# Altium PCB NB3000XN.PcbDoc (part 5 of 71)
Units mil, origin at the board's own origin, x right, y up, seen from the top; angles counter-clockwise.
Board outline 9527.56 x 6929.77 mil, 6 copper layers (Top Layer, GND+SHIELD, MidLayer1, MidLayer2, P2 - 3V3+5V0, Bottom Layer), stack 62.375 mil thick; 832 components, 1027 nets, 4655 pads, 4981 vias.
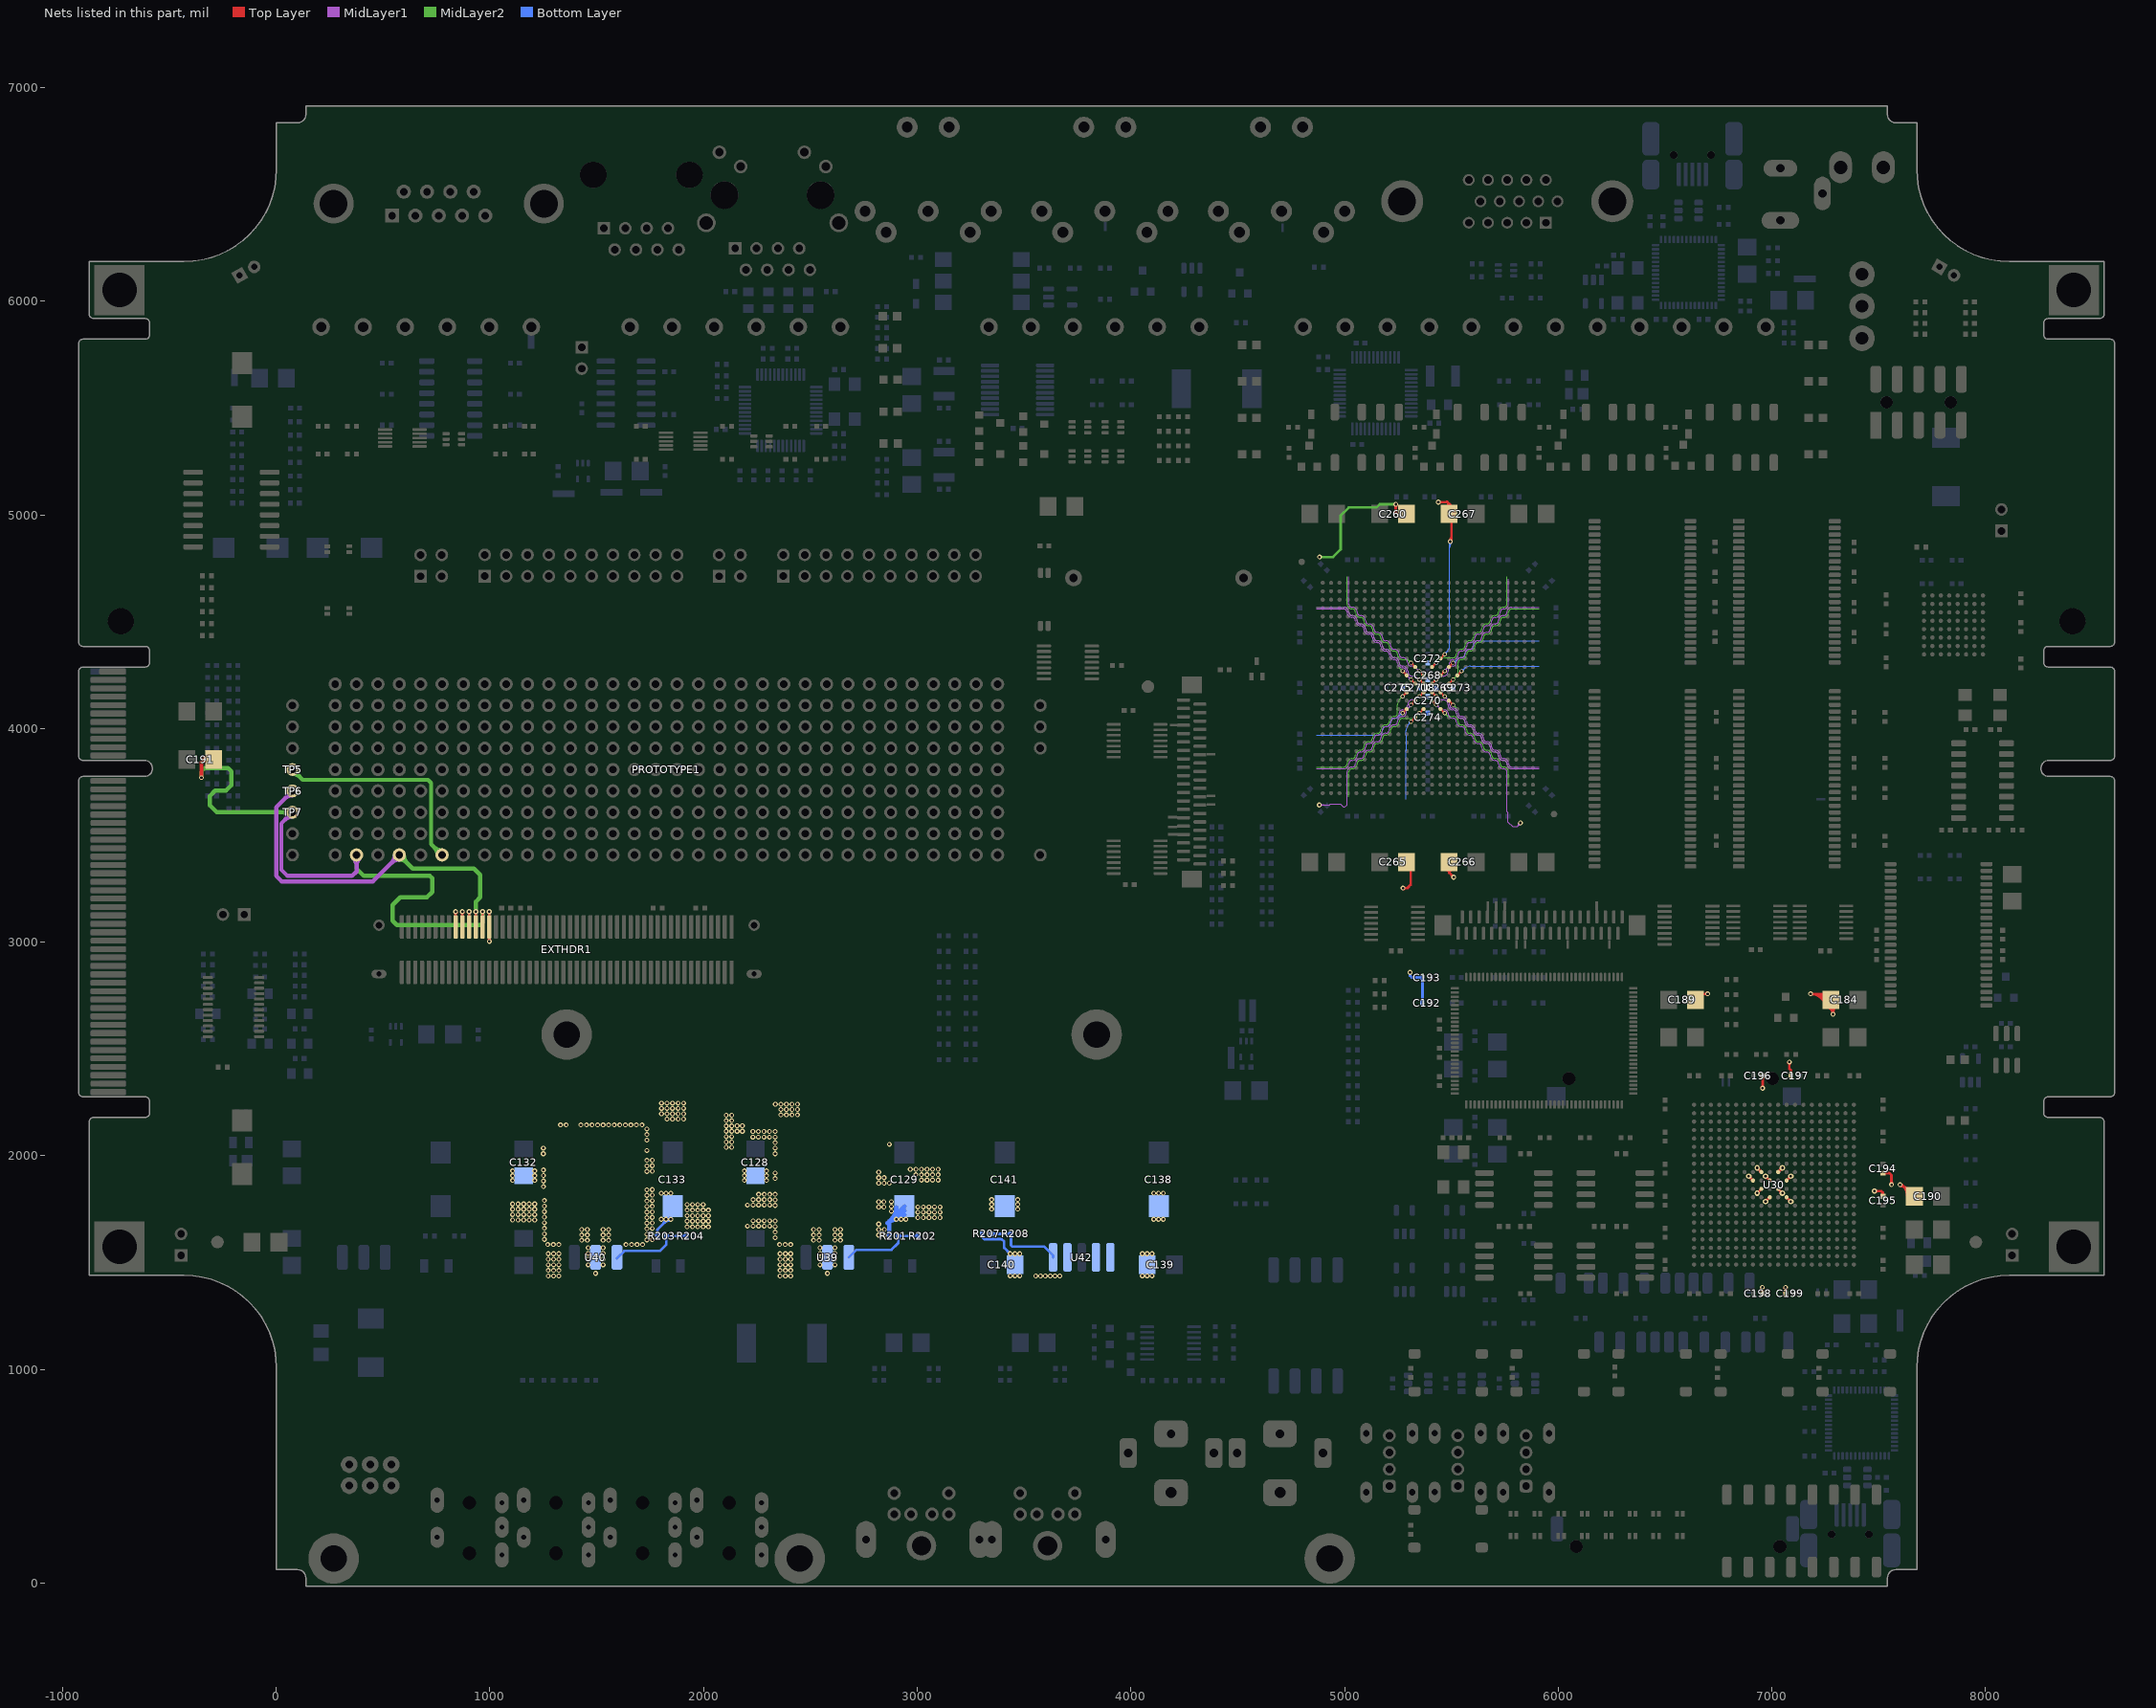
[diagram p9: the nets of this part, all layers, seen from the top]

## Via types
v1: diameter 23, hole 11.81, Top Layer to Bottom Layer, 3672 vias
v2: diameter 26, hole 11.81, Top Layer to Bottom Layer, 461 vias
v3: diameter 19, hole 11.81, Top Layer to Bottom Layer, tented both sides, 396 vias
v4: diameter 23.62, hole 11.81, Top Layer to Bottom Layer, 288 vias
v5: diameter 20, hole 11.81, Top Layer to Bottom Layer, 91 vias
v6: diameter 23, hole 11.81, Top Layer to Bottom Layer, tented both sides, 50 vias
v7: diameter 31, hole 11.81, Top Layer to Bottom Layer, 15 vias
v8: diameter 27.56, hole 11.81, Top Layer to Bottom Layer, tented both sides, 4 vias
v9: diameter 29, hole 11.81, Top Layer to Bottom Layer, 3 vias
v10: diameter 21, hole 11.81, Top Layer to Bottom Layer, 1 vias

## Nets (pads, with @x,y where several pads share a name; then routed paths per layer and width w, separated by ;. In a path a pad name is that pad's centre, name@x,y a point inside that pad or via, vN(x,y) a via of type N, cw(c..) or ccw(c..) an arc to the next point about the centre after c; other vN are vias at no path point)
1V2: C140.1 C141.1 C184.1 C189.1 C190.1 C191.1 C192.1 C193.1 C194.1 C195.1 C196.1 C197.1 C198.1 C199.1 C260.1 C265.1 C266.1 C267.1 C268.1 C269.1 C270.1 C271.1 C272.1 C273.1 C274.1 C275.1 EXTHDR1.73 EXTHDR1.75 PROTOTYPE1.2 R207.2 TP7.1 U8.K15 U8.L12 U8.L14 U8.L16 U8.M11 U8.M13 U8.M15 U8.M17 U8.N12 U8.N13 U8.N14 U8.N16 U8.P11 U8.P13 U8.P14 U8.P15 U8.R12 U8.R14 U8.R16 U8.T11 U8.T13 U8.T15 U8.U12 U30.J10 U30.J12 U30.K9 U30.K11 U30.L10 U30.L12 U30.M9 U30.M11 U30.N10 U42.4 | length 25616.4
  Top Layer w4: v3(5271.89,4071.89) U8.T11@5291.57,4091.57 ; v3(5271.89,4150.63) U8.P11@5291.57,4170.31 ; v3(5271.89,4268.74) U8.M11@5291.57,4249.06 ; U8.T11@5284.07,4091.57 cw(c5265.97,4091.57) 5278.77,4078.77 cw(c5291.57,4065.97) U8.T11@5291.57,4084.07 ; U8.P11@5284.07,4170.32 cw(c5265.97,4170.32) 5278.77,4157.51 cw(c5291.57,4144.71) U8.P11@5291.57,4162.81 ; U8.M11@5284.07,4249.06 ccw(c5265.97,4249.06) 5278.77,4261.86 ccw(c5291.57,4274.66) U8.M11@5291.57,4256.56 ; U8.T11@5284.23,4091.57 cw(c5266.51,4091.57) 5279.04,4079.04 cw(c5291.57,4066.51) U8.T11@5291.57,4084.23 ; U8.P11@5284.23,4170.32 cw(c5266.51,4170.32) 5279.04,4157.78 cw(c5291.57,4145.25) U8.P11@5291.57,4162.97 ; U8.M11@5284.23,4249.06 ccw(c5266.51,4249.06) 5279.04,4261.59 ccw(c5291.57,4274.12) U8.M11@5291.57,4256.4 ; v3(5311.26,4032.52) U8.U12@5330.94,4052.2 ; v3(5311.26,4111.26) U8.R12@5330.94,4130.94 ; v3(5311.26,4229.37) U8.N12@5330.94,4209.69 ; v3(5311.26,4308.11) U8.L12@5330.94,4288.43 ; U8.U12@5323.44,4052.2 cw(c5305.34,4052.2) 5318.14,4039.4 cw(c5330.94,4026.6) U8.U12@5330.94,4044.7 ; U8.R12@5323.44,4130.94 cw(c5305.34,4130.94) 5318.14,4118.14 cw(c5330.94,4105.34) U8.R12@5330.94,4123.44 ; U8.N12@5323.44,4209.69 ccw(c5305.34,4209.68) 5318.14,4222.49 ccw(c5330.94,4235.29) U8.N12@5330.94,4217.19 ; U8.L12@5323.44,4288.43 ccw(c5305.34,4288.43) 5318.14,4301.23 ccw(c5330.94,4314.03) U8.L12@5330.94,4295.93 ; U8.U12@5323.6,4052.2 cw(c5305.88,4052.2) 5318.41,4039.67 cw(c5330.94,4027.14) U8.U12@5330.94,4044.86 ; U8.R12@5323.6,4130.94 cw(c5305.88,4130.94) 5318.41,4118.41 cw(c5330.94,4105.88) U8.R12@5330.94,4123.6 ; U8.N12@5323.6,4209.69 ccw(c5305.88,4209.68) 5318.41,4222.22 ccw(c5330.94,4234.75) U8.N12@5330.94,4217.03 ; U8.L12@5323.6,4288.43 ccw(c5305.88,4288.43) 5318.41,4300.96 ccw(c5330.94,4313.49) U8.L12@5330.94,4295.77 ; v3(5350.63,4071.89) U8.T13@5370.31,4091.57 ; v3(5350.63,4150.63) U8.P13@5370.31,4170.31 ; v3(5350.63,4229.37) U8.N13@5370.31,4209.69 ; v3(5350.63,4268.74) U8.M13@5370.31,4249.06 ; U8.T13@5362.81,4091.57 cw(c5344.71,4091.57) 5357.51,4078.77 cw(c5370.31,4065.97) U8.T13@5370.31,4084.07 ; U8.P13@5362.81,4170.32 cw(c5344.71,4170.32) 5357.51,4157.51 cw(c5370.31,4144.71) U8.P13@5370.31,4162.81 ; U8.N13@5362.81,4209.69 ccw(c5344.71,4209.68) 5357.51,4222.49 ccw(c5370.31,4235.29) U8.N13@5370.31,4217.19 ; U8.M13@5362.81,4249.06 ccw(c5344.71,4249.06) 5357.51,4261.86 ccw(c5370.31,4274.66) U8.M13@5370.31,4256.56 ; U8.T13@5362.97,4091.57 cw(c5345.25,4091.57) 5357.78,4079.04 cw(c5370.31,4066.51) U8.T13@5370.31,4084.23 ; U8.P13@5362.97,4170.32 cw(c5345.25,4170.32) 5357.78,4157.78 cw(c5370.31,4145.25) U8.P13@5370.31,4162.97 ; U8.N13@5362.97,4209.69 ccw(c5345.25,4209.68) 5357.78,4222.22 ccw(c5370.31,4234.75) U8.N13@5370.31,4217.03 ; U8.M13@5362.97,4249.06 ccw(c5345.25,4249.06) 5357.78,4261.59 ccw(c5370.31,4274.12) U8.M13@5370.31,4256.4 ; U8.R14@5409.69,4123.44 cw(c5409.69,4105.34) 5422.49,4118.14 cw(c5435.29,4130.94) U8.R14@5417.19,4130.94 ; U8.R14@5409.69,4123.6 cw(c5409.69,4105.88) 5422.22,4118.41 cw(c5434.75,4130.94) U8.R14@5417.03,4130.94 ; U8.R14@5409.69,4130.94 v3(5429.37,4111.26) ; U8.P14@5409.69,4162.81 cw(c5409.69,4144.71) 5422.49,4157.51 cw(c5435.29,4170.32) U8.P14@5417.19,4170.32 ; U8.P14@5409.69,4162.97 cw(c5409.69,4145.25) 5422.22,4157.78 cw(c5434.75,4170.32) U8.P14@5417.03,4170.32 ; U8.P14@5409.69,4170.31 v3(5429.37,4150.63) ; U8.N14@5409.69,4209.69 v3(5429.37,4229.37) ; U8.N14@5409.69,4217.03 ccw(c5409.69,4234.75) 5422.22,4222.22 ccw(c5434.75,4209.68) U8.N14@5417.03,4209.69 ; U8.N14@5409.69,4217.19 ccw(c5409.69,4235.29) 5422.49,4222.49 ccw(c5435.29,4209.68) U8.N14@5417.19,4209.69 ; U8.L14@5409.69,4288.43 v3(5429.37,4308.11) ; U8.L14@5409.69,4295.77 ccw(c5409.69,4313.49) 5422.22,4300.96 ccw(c5434.75,4288.43) U8.L14@5417.03,4288.43 ; U8.L14@5409.69,4295.93 ccw(c5409.69,4314.03) 5422.49,4301.23 ccw(c5435.29,4288.43) U8.L14@5417.19,4288.43 ; U8.T15@5449.06,4084.07 cw(c5449.06,4065.97) 5461.86,4078.77 cw(c5474.66,4091.57) U8.T15@5456.56,4091.57 ; U8.T15@5449.06,4084.23 cw(c5449.06,4066.51) 5461.59,4079.04 cw(c5474.12,4091.57) U8.T15@5456.4,4091.57 ; U8.T15@5449.06,4091.57 v3(5468.74,4071.89) ; U8.P15@5449.06,4162.81 cw(c5449.06,4144.71) 5461.86,4157.51 cw(c5474.66,4170.32) U8.P15@5456.56,4170.32 ; U8.P15@5449.06,4162.97 cw(c5449.06,4145.25) 5461.59,4157.78 cw(c5474.12,4170.32) U8.P15@5456.4,4170.32 ; U8.P15@5449.06,4170.31 v3(5468.74,4150.63) ; U8.M15@5449.06,4249.06 v3(5468.74,4268.74) ; U8.M15@5449.06,4256.4 ccw(c5449.06,4274.12) 5461.59,4261.59 ccw(c5474.12,4249.06) U8.M15@5456.4,4249.06 ; U8.M15@5449.06,4256.56 ccw(c5449.06,4274.66) 5461.86,4261.86 ccw(c5474.66,4249.06) U8.M15@5456.56,4249.06 ; U8.K15@5449.06,4327.8 v3(5468.74,4347.48) ; U8.K15@5449.06,4335.14 ccw(c5449.06,4352.86) 5461.59,4340.33 ccw(c5474.12,4327.8) U8.K15@5456.4,4327.8 ; U8.K15@5449.06,4335.3 ccw(c5449.06,4353.4) 5461.86,4340.6 ccw(c5474.66,4327.8) U8.K15@5456.56,4327.8 ; U8.R16@5488.43,4123.44 cw(c5488.43,4105.34) 5501.23,4118.14 cw(c5514.03,4130.94) U8.R16@5495.93,4130.94 ; U8.R16@5488.43,4123.6 cw(c5488.43,4105.88) 5500.96,4118.41 cw(c5513.49,4130.94) U8.R16@5495.77,4130.94 ; U8.R16@5488.43,4130.94 v3(5508.11,4111.26) ; U8.N16@5488.43,4209.69 v3(5508.11,4229.37) ; U8.N16@5488.43,4217.03 ccw(c5488.43,4234.75) 5500.96,4222.22 ccw(c5513.49,4209.68) U8.N16@5495.77,4209.69 ; U8.N16@5488.43,4217.19 ccw(c5488.43,4235.29) 5501.23,4222.49 ccw(c5514.03,4209.68) U8.N16@5495.93,4209.69 ; U8.L16@5488.43,4288.43 v3(5508.11,4308.11) ; U8.L16@5488.43,4295.77 ccw(c5488.43,4313.49) 5500.96,4300.96 ccw(c5513.49,4288.43) U8.L16@5495.77,4288.43 ; U8.L16@5488.43,4295.93 ccw(c5488.43,4314.03) 5501.23,4301.23 ccw(c5514.03,4288.43) U8.L16@5495.93,4288.43 ; U8.M17@5527.8,4249.06 v3(5547.48,4268.74) ; U8.M17@5527.8,4256.4 ccw(c5527.8,4274.12) 5540.33,4261.59 ccw(c5552.86,4249.06) U8.M17@5535.14,4249.06 ; U8.M17@5527.8,4256.56 ccw(c5527.8,4274.66) 5540.6,4261.86 ccw(c5553.4,4249.06) U8.M17@5535.3,4249.06 ; C196.1@6956.86,2375 C196.1@6956.86,2376.19 ; v1@5234.86,5050.04 5240,5050.04 v1@5234.9,5050 ; v1@5234.86,5050.04 v1@5234.9,5050 ; 5284.69,4084.69 cw(c5271.89,4097.5) 5271.89,4079.39 ccw(c5271.89,4097.5) 5284.69,4084.69 ; 5284.69,4084.69 ccw(c5297.5,4071.89) 5279.39,4071.89 cw(c5297.5,4071.89) 5284.69,4084.69 ; 5284.69,4163.43 cw(c5271.89,4176.24) 5271.89,4158.13 ccw(c5271.89,4176.24) 5284.69,4163.43 ; 5284.69,4163.43 ccw(c5297.5,4150.63) 5279.39,4150.63 cw(c5297.5,4150.63) 5284.69,4163.43 ; 5284.69,4255.94 cw(c5297.5,4268.74) 5279.39,4268.74 ccw(c5297.5,4268.74) 5284.69,4255.94 ; 5284.69,4255.94 ccw(c5271.89,4243.13) 5271.89,4261.24 cw(c5271.89,4243.13) 5284.69,4255.94 ; 5324.06,4045.32 cw(c5311.26,4058.13) 5311.26,4040.02 ccw(c5311.26,4058.13) 5324.06,4045.32 ; 5324.06,4045.32 ccw(c5336.87,4032.52) 5318.76,4032.52 cw(c5336.87,4032.52) 5324.06,4045.32 ; 5324.06,4124.06 cw(c5311.26,4136.87) 5311.26,4118.76 ccw(c5311.26,4136.87) 5324.06,4124.06 ; 5324.06,4124.06 ccw(c5336.87,4111.26) 5318.76,4111.26 cw(c5336.87,4111.26) 5324.06,4124.06 ; 5324.06,4216.57 cw(c5336.87,4229.37) 5318.76,4229.37 ccw(c5336.87,4229.37) 5324.06,4216.57 ; 5324.06,4216.57 ccw(c5311.26,4203.76) 5311.26,4221.87 cw(c5311.26,4203.76) 5324.06,4216.57 ; 5324.06,4295.31 cw(c5336.87,4308.11) 5318.76,4308.11 ccw(c5336.87,4308.11) 5324.06,4295.31 ; 5324.06,4295.31 ccw(c5311.26,4282.5) 5311.26,4300.61 cw(c5311.26,4282.5) 5324.06,4295.31 ; 5363.43,4084.69 cw(c5350.63,4097.5) 5350.63,4079.39 ccw(c5350.63,4097.5) 5363.43,4084.69 ; 5363.43,4084.69 ccw(c5376.24,4071.89) 5358.13,4071.89 cw(c5376.24,4071.89) 5363.43,4084.69 ; 5363.43,4163.43 cw(c5350.63,4176.24) 5350.63,4158.13 ccw(c5350.63,4176.24) 5363.43,4163.43 ; 5363.43,4163.43 ccw(c5376.24,4150.63) 5358.13,4150.63 cw(c5376.24,4150.63) 5363.43,4163.43 ; 5363.43,4216.57 cw(c5376.24,4229.37) 5358.13,4229.37 ccw(c5376.24,4229.37) 5363.43,4216.57 ; 5363.43,4216.57 ccw(c5350.63,4203.76) 5350.63,4221.87 cw(c5350.63,4203.76) 5363.43,4216.57 ; 5363.43,4255.94 cw(c5376.24,4268.74) 5358.13,4268.74 ccw(c5376.24,4268.74) 5363.43,4255.94 ; 5363.43,4255.94 ccw(c5350.63,4243.13) 5350.63,4261.24 cw(c5350.63,4243.13) 5363.43,4255.94 ; 5416.57,4124.06 cw(c5403.76,4111.26) 5421.87,4111.26 ccw(c5403.76,4111.26) 5416.57,4124.06 ; 5416.57,4124.06 ccw(c5429.37,4136.87) 5429.37,4118.76 cw(c5429.37,4136.87) 5416.57,4124.06 ; 5416.57,4163.43 cw(c5403.76,4150.63) 5421.87,4150.63 ccw(c5403.76,4150.63) 5416.57,4163.43 ; 5416.57,4163.43 ccw(c5429.37,4176.24) 5429.37,4158.13 cw(c5429.37,4176.24) 5416.57,4163.43 ; 5416.57,4216.57 cw(c5429.37,4203.76) 5429.37,4221.87 ccw(c5429.37,4203.76) 5416.57,4216.57 ; 5416.57,4216.57 ccw(c5403.76,4229.37) 5421.87,4229.37 cw(c5403.76,4229.37) 5416.57,4216.57 ; 5416.57,4295.31 cw(c5429.37,4282.5) 5429.37,4300.61 ccw(c5429.37,4282.5) 5416.57,4295.31 ; 5416.57,4295.31 ccw(c5403.76,4308.11) 5421.87,4308.11 cw(c5403.76,4308.11) 5416.57,4295.31 ; 5455.94,4084.69 cw(c5443.13,4071.89) 5461.24,4071.89 ccw(c5443.13,4071.89) 5455.94,4084.69 ; 5455.94,4084.69 ccw(c5468.74,4097.5) 5468.74,4079.39 cw(c5468.74,4097.5) 5455.94,4084.69 ; 5455.94,4163.43 cw(c5443.13,4150.63) 5461.24,4150.63 ccw(c5443.13,4150.63) 5455.94,4163.43 ; 5455.94,4163.43 ccw(c5468.74,4176.24) 5468.74,4158.13 cw(c5468.74,4176.24) 5455.94,4163.43 ; 5455.94,4255.94 cw(c5468.74,4243.13) 5468.74,4261.24 ccw(c5468.74,4243.13) 5455.94,4255.94 ; 5455.94,4255.94 ccw(c5443.13,4268.74) 5461.24,4268.74 cw(c5443.13,4268.74) 5455.94,4255.94 ; 5455.94,4334.68 cw(c5468.74,4321.87) 5468.74,4339.98 ccw(c5468.74,4321.87) 5455.94,4334.68 ; 5455.94,4334.68 ccw(c5443.13,4347.48) 5461.24,4347.48 cw(c5443.13,4347.48) 5455.94,4334.68 ; 5495.31,4124.06 cw(c5482.5,4111.26) 5500.61,4111.26 ccw(c5482.5,4111.26) 5495.31,4124.06 ; 5495.31,4124.06 ccw(c5508.11,4136.87) 5508.11,4118.76 cw(c5508.11,4136.87) 5495.31,4124.06 ; 5495.31,4216.57 cw(c5508.11,4203.76) 5508.11,4221.87 ccw(c5508.11,4203.76) 5495.31,4216.57 ; 5495.31,4216.57 ccw(c5482.5,4229.37) 5500.61,4229.37 cw(c5482.5,4229.37) 5495.31,4216.57 ; 5495.31,4295.31 cw(c5508.11,4282.5) 5508.11,4300.61 ccw(c5508.11,4282.5) 5495.31,4295.31 ; 5495.31,4295.31 ccw(c5482.5,4308.11) 5500.61,4308.11 cw(c5482.5,4308.11) 5495.31,4295.31 ; 5534.68,4255.94 cw(c5547.48,4243.13) 5547.48,4261.24 ccw(c5547.48,4243.13) 5534.68,4255.94 ; 5534.68,4255.94 ccw(c5521.87,4268.74) 5539.98,4268.74 cw(c5521.87,4268.74) 5534.68,4255.94
  Top Layer w8: v2@6891.89,1895.37 cw(c6891.89,1873.64) 6907.25,1889.01 cw(c6922.62,1904.37) v2@6900.89,1904.37 ; v2(6891.89,1904.37) U30.N10@6911.57,1884.68 ; U30.N10@6905.73,1884.68 ccw(c6891.63,1884.68) 6901.6,1894.66 ccw(c6911.57,1904.63) U30.N10@6911.57,1890.53 ; v2(6931.26,1825.63) U30.M11@6950.94,1845.31 ; v2@6931.26,1834.63 ccw(c6931.26,1856.36) 6946.62,1840.99 ccw(c6961.99,1825.63) v2@6940.26,1825.63 ; v2@6931.26,1934.74 cw(c6931.26,1913.01) 6946.62,1928.38 cw(c6961.99,1943.74) v2@6940.26,1943.74 ; v2(6931.26,1943.74) U30.M9@6950.94,1924.06 ; U30.M11@6945.1,1845.31 cw(c6931,1845.31) 6940.97,1835.34 cw(c6950.94,1825.37) U30.M11@6950.94,1839.47 ; U30.M9@6945.1,1924.06 ccw(c6931,1924.06) 6940.97,1934.03 ccw(c6950.94,1944) U30.M9@6950.94,1929.9 ; v2(6970.63,1786.26) U30.L12@6990.31,1805.94 ; v2@6970.63,1795.26 ccw(c6970.63,1816.99) 6985.99,1801.62 ccw(c7001.36,1786.26) v2@6979.63,1786.26 ; v2@6970.63,1895.37 cw(c6970.63,1873.64) 6985.99,1889.01 cw(c7001.36,1904.37) v2@6979.63,1904.37 ; v2(6970.63,1904.37) U30.L10@6990.31,1884.68 ; U30.L12@6984.47,1805.94 cw(c6970.37,1805.94) 6980.34,1795.97 cw(c6990.31,1786) U30.L12@6990.31,1800.1 ; U30.L10@6984.47,1884.68 ccw(c6970.37,1884.68) 6980.34,1894.66 ccw(c6990.31,1904.63) U30.L10@6990.31,1890.53 ; U30.K11@7029.69,1839.47 cw(c7029.69,1825.37) 7039.66,1835.34 cw(c7049.63,1845.31) U30.K11@7035.53,1845.31 ; U30.K11@7029.69,1845.31 v2(7049.37,1825.63) ; U30.K9@7029.69,1924.06 v2(7049.37,1943.74) ; U30.K9@7029.69,1929.9 ccw(c7029.69,1944) 7039.66,1934.03 ccw(c7049.63,1924.06) U30.K9@7035.53,1924.06 ; v2@7040.37,1825.63 ccw(c7018.64,1825.63) 7034.01,1840.99 ccw(c7049.37,1856.36) v2@7049.37,1834.63 ; v2@7040.37,1943.74 cw(c7018.64,1943.74) 7034.01,1928.38 cw(c7049.37,1913.01) v2@7049.37,1934.74 ; U30.J12@7069.06,1800.1 cw(c7069.06,1786) 7079.03,1795.97 cw(c7089,1805.94) U30.J12@7074.9,1805.94 ; U30.J12@7069.06,1805.94 v2(7088.74,1786.26) ; U30.J10@7069.06,1884.68 v2(7088.74,1904.37) ; U30.J10@7069.06,1890.53 ccw(c7069.06,1904.63) 7079.03,1894.66 ccw(c7089,1884.68) U30.J10@7074.9,1884.68 ; v2@7079.74,1786.26 ccw(c7058.01,1786.26) 7073.38,1801.62 ccw(c7088.74,1816.99) v2@7088.74,1795.26 ; v2@7079.74,1904.37 cw(c7058.01,1904.37) 7073.38,1889.01 cw(c7088.74,1873.64) v2@7088.74,1895.37
  Top Layer w12: C191.1@-304.81,3842.2 C191.1@-292.01,3855 ; v1@961.92,3139.15 cw(c952.15,3129.38) 965.97,3129.38 ; EXTHDR1.75@965.97,3071.85 v1@965.97,3142.88 ; 965.97,3130.14 cw(c978.71,3130.14) v1@969.7,3139.15 ; v1@993.42,3139.15 cw(c983.65,3129.38) 997.46,3129.38 ; v1@993.73,3007.7 ccw(c984.72,3016.71) 997.46,3016.71 ; v1@997.46,3003.96 EXTHDR1.73@997.46,3071.85 ; EXTHDR1.73@997.46,3017.46 ccw(c1011.28,3017.46) v1@1001.51,3007.7 ; EXTHDR1.73@997.46,3075 EXTHDR1.73@997.46,3071.85 ; 997.46,3130.14 cw(c1010.21,3130.14) v1@1001.2,3139.15 ; v1@997.46,3142.88 EXTHDR1.73@997.46,3071.85 ; v1@5236.11,5046.11 cw(c5226.72,5036.72) 5240,5036.72 cw(c5253.28,5036.72) v1@5243.89,5046.11 ; v1(5240,5050) 5240,5015 5250,5005 ; C260.1@5257.53,4998.77 ccw(c5250,4997.33) 5250,5005 ; C260.1@5257.53,5011.23 cw(c5250,5012.67) 5250,5005 ; v1(5273.52,3253.37) 5294.52,3253.37 5310,3268.85 5310,3345.31 5290.31,3365 C265.1@5290.31,3375 ; v1@5277.41,3249.49 cw(c5286.8,3240.1) 5286.8,3253.37 cw(c5286.8,3266.65) v1@5277.41,3257.26 ; C260.1@5290.31,5005 5250,5005 ; v1(5438.86,5059.71) 5481.69,5059.71 5489.68,5051.71 ; v1@5442.75,5055.82 cw(c5452.14,5046.43) 5452.14,5059.71 cw(c5452.14,5072.99) v1@5442.75,5063.6 ; 5479.46,5061.94 cw(c5454.23,5036.72) C267.1@5482.31,5014.72 ; C266.1@5479.65,3339.24 cw(c5475.33,3325.55) 5489.69,3325.55 ; C267.1@5481.57,5041.31 ccw(c5478.96,5051.71) 5489.68,5051.71 ; 5489.03,5052.36 cw(c5464.97,5028.3) C267.1@5491.76,5007.32 ; C266.1@5489.68,3375 5489.69,3325.55 ; v1@5491.11,4878.89 ccw(c5466.78,4903.22) 5501.19,4903.22 ; C267.1@5497.8,5041.31 cw(c5500.41,5051.71) 5489.69,5051.71 ; C266.1@5499.72,3339.24 ccw(c5504.04,3325.55) 5489.69,3325.55 ; v1@5501.19,4875 5501.19,4993.49 C267.1@5489.68,5005 5489.68,5051.71 ; v1@5505.69,3304.04 ccw(c5492.41,3304.04) 5501.8,3313.43 ccw(c5511.19,3322.82) v1@5511.19,3309.54 ; v1(5511.19,3304.04) 5489.69,3325.55 ; C189.1@6642.99,2730 6671.37,2758.37 v1(6699.86,2758.37) ; v1@6695.97,2754.49 ccw(c6686.58,2745.1) 6686.58,2758.37 ccw(c6686.58,2771.65) v1@6695.97,2762.26 ; C198.1@6951.56,1359.11 ccw(c6941.64,1369.03) 6955.67,1369.03 ccw(c6969.7,1369.03) C198.1@6959.78,1359.11 ; C196.1@6951.56,2370.89 cw(c6938.77,2358.1) 6956.86,2358.1 ; v1@6951.78,1380.44 cw(c6942.39,1371.05) 6955.67,1371.05 cw(c6968.95,1371.05) v1@6959.56,1380.44 ; v1@6952.97,2320.6 ccw(c6943.58,2329.99) 6956.86,2329.99 ccw(c6970.14,2329.99) v1@6960.75,2320.6 ; C198.1@6955.67,1355 v1(6955.67,1384.33) ; C196.1@6955.67,2375 6956.86,2373.81 v1(6956.86,2316.71) ; C199.1@7060.22,1359.11 ccw(c7050.3,1369.03) 7064.33,1369.03 ccw(c7078.36,1369.03) C199.1@7068.44,1359.11 ; v1@7060.44,1380.44 cw(c7051.05,1371.05) 7064.33,1371.05 cw(c7077.61,1371.05) v1@7068.22,1380.44 ; C199.1@7064.33,1355 v1(7064.33,1384.33) ; v1@7077.97,2435.49 cw(c7068.58,2426.1) 7081.86,2426.1 cw(c7095.14,2426.1) v1@7085.75,2435.49 ; v1(7081.86,2439.37) 7081.86,2408.14 7089.33,2400.67 C197.1@7089.33,2375 ; C197.1@7085.22,2379.11 ccw(c7075.3,2389.03) 7089.33,2389.03 ccw(c7103.36,2389.03) C197.1@7093.44,2379.11 ; v1@7185.08,2754.49 cw(c7194.47,2745.1) 7194.47,2758.37 cw(c7194.47,2771.65) v1@7185.08,2762.26 ; 7201.08,2758.37 cw(c7201.08,2693.92) C184.1@7258.1,2723.97 ; 7220.97,2758.37 cw(c7220.97,2704.4) C184.1@7268.72,2729.57 ; C184.1@7240.86,2758.37 cw(c7240.86,2714.89) C184.1@7279.33,2735.16 ; C184.1@7247.49,2718.38 ccw(c7181.19,2683.44) v1(7181.19,2758.37) 7248.63,2758.37 C184.1@7277.01,2730 7286.52,2720.48 v1(7286.52,2662.71) ; C184.1@7264.29,2695.21 cw(c7250.6,2662) v1@7286.52,2662 ; C184.1@7268.86,2706.31 cw(c7257.99,2679.92) 7286.52,2679.92 ; v1@7282.64,2666.6 ccw(c7273.25,2675.99) 7286.52,2675.99 ccw(c7299.8,2675.99) v1@7290.41,2666.6 ; v1@7286.52,2668.47 cw(c7334.6,2668.47) C184.1@7300.6,2702.47 ; v4(7480,1835) 7513.5,1835 7520,1828.5 C195.1@7520,1810.67 ; v4@7484.11,1830.89 cw(c7494.03,1820.97) 7494.03,1835 cw(c7494.03,1849.03) v4@7484.11,1839.11 ; C195.1@7515.89,1814.78 ccw(c7505.97,1824.7) 7520,1824.7 ccw(c7534.03,1824.7) C195.1@7524.11,1814.78 ; C194.1@7520,1919.33 7550.67,1919.33 7560,1910 v4(7560,1865) ; C194.1@7524.11,1915.22 cw(c7534.03,1905.3) 7534.03,1919.33 cw(c7534.03,1933.36) C194.1@7524.11,1923.44 ; v4@7555.89,1869.11 ccw(c7545.97,1879.03) 7560,1879.03 ccw(c7574.03,1879.03) v4@7564.11,1869.11 ; v1@7600,1859.5 cw(c7600,1825.98) 7623.7,1849.68 ; v1(7600,1865) 7608.39,1865 7663.39,1810 C190.1@7667.01,1810 C190.1@7665.2,1808.19 ; 7612.17,1861.22 ccw(c7649.88,1898.93) C190.1@7660.41,1846.65 ; 7615.39,1858 cw(c7571.32,1813.94) C190.1@7633.64,1813.94 ; C190.1@7627.99,1845.39 ccw(c7655.19,1872.59) C190.1@7662.79,1834.89
  Top Layer w20: v10(-350,3770) -350,3845 -340,3855 ; -340.86,3854.14 cw(c-309.92,3823.19) C191.1@-286.26,3860.01 ; C191.1@-318.16,3841.64 ccw(c-340,3830.48) -340,3855 ; C191.1@-318.16,3868.36 cw(c-340,3879.52) -340,3855 ; C191.1@-292.01,3855 -340,3855
  MidLayer1 w4: 4870,3811.9 4879.78,3811.9 4938.04,3811.9 4996.3,3811.9 ccw(c4996.3,3835.67) 5020.07,3835.67 cw(c5035.67,3835.67) 5035.67,3851.27 ccw(c5035.67,3875.04) 5059.44,3875.04 cw(c5075.04,3875.04) 5075.04,3890.64 ccw(c5075.04,3914.41) 5098.81,3914.41 cw(c5114.41,3914.41) 5114.41,3930.01 ccw(c5114.41,3953.78) 5138.18,3953.78 cw(c5153.78,3953.78) 5153.78,3969.38 ccw(c5153.78,3993.15) 5177.55,3993.15 cw(c5193.15,3993.15) 5193.15,4008.75 ccw(c5193.15,4032.52) 5216.92,4032.52 cw(c5232.52,4032.52) 5232.52,4048.12 ccw(c5232.52,4071.89) 5256.29,4071.89 cw(c5271.89,4071.89) 5271.89,4087.49 ccw(c5271.89,4111.26) 5295.66,4111.26 cw(c5319.43,4111.26) 5319.43,4135.03 ; 4870,4559.93 4879.78,4559.93 4938.04,4559.93 4996.3,4559.93 cw(c4996.3,4544.33) 5011.9,4544.33 ccw(c5035.67,4544.33) 5035.67,4520.56 cw(c5035.67,4504.96) 5051.27,4504.96 ccw(c5075.04,4504.96) 5075.04,4481.19 cw(c5075.04,4465.59) 5090.64,4465.59 ccw(c5114.41,4465.59) 5114.41,4441.82 cw(c5114.41,4426.22) 5130.01,4426.22 ccw(c5153.78,4426.22) 5153.78,4402.45 cw(c5153.78,4386.85) 5169.38,4386.85 ccw(c5193.15,4386.85) 5193.15,4363.08 cw(c5193.15,4347.48) 5208.75,4347.48 ccw(c5232.52,4347.48) 5232.52,4323.71 cw(c5232.52,4308.11) 5248.12,4308.11 ccw(c5271.89,4308.11) 5271.89,4284.34 cw(c5271.89,4268.74) 5287.49,4268.74 ; 4870,4568.1 4879.78,4568.1 4938.04,4568.1 4996.3,4568.1 cw(c4996.3,4544.33) 5020.07,4544.33 ccw(c5035.67,4544.33) 5035.67,4528.73 cw(c5035.67,4504.96) 5059.44,4504.96 ccw(c5075.04,4504.96) 5075.04,4489.36 cw(c5075.04,4465.59) 5098.81,4465.59 ccw(c5114.41,4465.59) 5114.41,4449.99 cw(c5114.41,4426.22) 5138.18,4426.22 ccw(c5153.78,4426.22) 5153.78,4410.62 cw(c5153.78,4386.85) 5177.55,4386.85 ccw(c5193.15,4386.85) 5193.15,4371.25 cw(c5193.15,4347.48) 5216.92,4347.48 ccw(c5232.52,4347.48) 5232.52,4331.88 cw(c5232.52,4308.11) 5256.29,4308.11 ccw(c5271.89,4308.11) 5271.89,4292.51 cw(c5271.89,4268.74) 5295.66,4268.74 ccw(c5319.43,4268.74) 5319.43,4244.97 ; v1(4881.86,3642.37) 4930,3642.37 4933.5,3645.87 4980.44,3645.87 4993.31,3633 5001.69,3633 5011.9,3643.21 5011.9,3660 5011.9,3670 5011.9,3679.78 5011.9,3738.04 5011.9,3796.3 cw(c5035.67,3796.3) 5035.67,3820.07 ccw(c5035.67,3835.67) 5051.27,3835.67 cw(c5075.04,3835.67) 5075.04,3859.44 ccw(c5075.04,3875.04) 5090.64,3875.04 cw(c5114.41,3875.04) 5114.41,3898.81 ccw(c5114.41,3914.41) 5130.01,3914.41 cw(c5153.78,3914.41) 5153.78,3938.18 ccw(c5153.78,3953.78) 5169.38,3953.78 cw(c5193.15,3953.78) 5193.15,3977.55 ccw(c5193.15,3993.15) 5208.75,3993.15 cw(c5232.52,3993.15) 5232.52,4016.92 ccw(c5232.52,4032.52) 5248.12,4032.52 cw(c5271.89,4032.52) 5271.89,4056.29 ccw(c5271.89,4071.89) 5287.49,4071.89 cw(c5311.26,4071.89) 5294.45,4088.7 5300.87,4096.43 ; v1@4881.86,4800.04 v1@4883,4800.04 ; v1(4883,4803) v1@4885.96,4800.04 ; v1@4885.75,3638.49 cw(c4895.14,3629.1) 4895.14,3642.37 cw(c4895.14,3655.65) v1@4885.75,3646.26 ; v1@4888.57,3635.66 cw(c4904.79,3619.44) 4904.79,3642.37 cw(c4904.79,3665.31) v1@4888.57,3649.09 ; 5020.07,4710 5020.07,4700.22 5020.07,4641.96 5020.07,4583.7 ccw(c5035.67,4583.7) 5035.67,4568.1 cw(c5035.67,4544.33) 5059.44,4544.33 ccw(c5075.04,4544.33) 5075.04,4528.73 cw(c5075.04,4504.96) 5098.81,4504.96 ccw(c5114.41,4504.96) 5114.41,4489.36 cw(c5114.41,4465.59) 5138.18,4465.59 ccw(c5153.78,4465.59) 5153.78,4449.99 cw(c5153.78,4426.22) 5177.55,4426.22 ccw(c5193.15,4426.22) 5193.15,4410.62 cw(c5193.15,4386.85) 5216.92,4386.85 ccw(c5232.52,4386.85) 5232.52,4371.25 cw(c5232.52,4347.48) 5256.29,4347.48 ccw(c5271.89,4347.48) 5271.89,4331.88 cw(c5271.89,4308.11) 5295.66,4308.11 ccw(c5311.26,4308.11) 5311.26,4292.51 ; 5287.4,4269.25 ccw(c5326.07,4269.25) 5298.73,4241.9 ; v3@5303.87,4109.96 cw(c5286.04,4106.81) 5300.87,4096.43 ; v3@5303.92,4229.37 ccw(c5286.19,4229.37) 5298.73,4241.9 ; 5310.75,4292.6 cw(c5310.75,4253.93) 5338.1,4281.27 ; v3@5311.26,4236.71 cw(c5311.26,4254.44) 5298.73,4241.9 ; v3@5312.56,4103.87 ccw(c5315.71,4086.04) 5300.87,4096.43 ; 5319.43,4135.08 ccw(c5321.04,4158.8) 5335.83,4140.2 ; 5319.43,4244.92 cw(c5321.04,4221.2) 5335.83,4239.8 ; v3@5343.24,4151.93 cw(c5325.41,4155.08) 5335.8,4140.24 cw(c5346.18,4125.41) v3@5349.33,4143.24 ; v3@5343.24,4228.07 ccw(c5325.41,4224.92) 5335.8,4239.76 ccw(c5346.18,4254.59) v3@5349.33,4236.76 ; v3@5343.29,4268.74 ccw(c5325.56,4268.74) 5338.1,4281.27 ; v3@5350.63,4276.08 cw(c5350.63,4293.81) 5338.1,4281.27 ; v3@5429.37,4103.92 cw(c5429.37,4086.19) 5441.9,4098.73 ; v3@5430.67,4143.24 cw(c5433.82,4125.41) 5444.2,4140.24 cw(c5454.59,4155.08) v3@5436.76,4151.93 ; v3@5430.67,4236.76 ccw(c5433.82,4254.59) 5444.2,4239.76 ccw(c5454.59,4224.92) v3@5436.76,4228.07 ; v3@5436.71,4111.26 ccw(c5454.44,4111.26) 5441.9,4098.73 ; 5444.17,4140.2 ccw(c5458.96,4158.8) 5460.57,4135.08 ; 5444.17,4239.8 cw(c5458.96,4221.2) 5460.57,4244.92 ; 5460.57,4135.03 cw(c5460.57,4111.26) 5484.34,4111.26 ccw(c5508.11,4111.26) 5508.11,4087.49 cw(c5508.11,4071.89) 5523.71,4071.89 ccw(c5547.48,4071.89) 5547.48,4048.12 cw(c5547.48,4032.52) 5563.08,4032.52 ccw(c5586.85,4032.52) 5586.85,4008.75 cw(c5586.85,3993.15) 5602.45,3993.15 ccw(c5626.22,3993.15) 5626.22,3969.38 cw(c5626.22,3953.78) 5641.82,3953.78 ccw(c5665.59,3953.78) 5665.59,3930.01 cw(c5665.59,3914.41) 5681.19,3914.41 ccw(c5704.96,3914.41) 5704.96,3890.64 cw(c5704.96,3875.04) 5720.56,3875.04 ccw(c5744.33,3875.04) 5744.33,3851.27 cw(c5744.33,3835.67) 5759.93,3835.67 ccw(c5783.7,3835.67) 5783.7,3811.9 5841.96,3811.9 5900.22,3811.9 5910,3811.9 ; 5460.57,4244.97 ccw(c5460.57,4268.74) 5484.34,4268.74 cw(c5508.11,4268.74) 5508.11,4292.51 ccw(c5508.11,4308.11) 5523.71,4308.11 cw(c5547.48,4308.11) 5547.48,4331.88 ccw(c5547.48,4347.48) 5563.08,4347.48 cw(c5586.85,4347.48) 5586.85,4371.25 ccw(c5586.85,4386.85) 5602.45,4386.85 cw(c5626.22,4386.85) 5626.22,4410.62 ccw(c5626.22,4426.22) 5641.82,4426.22 cw(c5665.59,4426.22) 5665.59,4449.99 ccw(c5665.59,4465.59) 5681.19,4465.59 cw(c5704.96,4465.59) 5704.96,4489.36 ccw(c5704.96,4504.96) 5720.56,4504.96 cw(c5744.33,4504.96) 5744.33,4528.73 ccw(c5744.33,4544.33) 5759.93,4544.33 cw(c5783.7,4544.33) 5783.7,4568.1 5841.96,4568.1 5900.22,4568.1 5910,4568.1 ; v3@5467.44,4276.13 ccw(c5464.29,4293.96) 5479.13,4283.57 ; 5468.74,4087.49 cw(c5468.74,4071.89) 5484.34,4071.89 ccw(c5508.11,4071.89) 5508.11,4048.12 cw(c5508.11,4032.52) 5523.71,4032.52 ccw(c5547.48,4032.52) 5547.48,4008.75 cw(c5547.48,3993.15) 5563.08,3993.15 ccw(c5586.85,3993.15) 5586.85,3969.38 cw(c5586.85,3953.78) 5602.45,3953.78 ccw(c5626.22,3953.78) 5626.22,3930.01 cw(c5626.22,3914.41) 5641.82,3914.41 ccw(c5665.59,3914.41) 5665.59,3890.64 cw(c5665.59,3875.04) 5681.19,3875.04 ccw(c5704.96,3875.04) 5704.96,3851.27 cw(c5704.96,3835.67) 5720.56,3835.67 ccw(c5744.33,3835.67) 5744.33,3811.9 cw(c5744.33,3796.3) 5759.93,3796.3 5759.93,3738.04 5759.93,3679.78 5759.93,3670 5759.93,3660 5759.93,3655.26 5759.93,3610.07 5765,3605 5765,3562.82 5786.45,3541.37 5808.63,3541.37 5823.52,3556.27 v1(5823.52,3558.37) ; v3@5468.74,4143.29 cw(c5468.74,4125.56) 5481.27,4138.1 ; 5469.25,4087.4 cw(c5469.25,4126.07) 5441.9,4098.73 ; v3@5476.08,4150.63 ccw(c5493.81,4150.63) 5481.27,4138.1 ; v3@5476.13,4270.04 cw(c5493.96,4273.19) 5479.13,4283.57 ; 5492.51,4111.26 ccw(c5508.11,4111.26) 5508.11,4095.66 cw(c5508.11,4071.89) 5531.88,4071.89 ccw(c5547.48,4071.89) 5547.48,4056.29 cw(c5547.48,4032.52) 5571.25,4032.52 ccw(c5586.85,4032.52) 5586.85,4016.92 cw(c5586.85,3993.15) 5610.62,3993.15 ccw(c5626.22,3993.15) 5626.22,3977.55 cw(c5626.22,3953.78) 5649.99,3953.78 ccw(c5665.59,3953.78) 5665.59,3938.18 cw(c5665.59,3914.41) 5689.36,3914.41 ccw(c5704.96,3914.41) 5704.96,3898.81 cw(c5704.96,3875.04) 5728.73,3875.04 ccw(c5744.33,3875.04) 5744.33,3859.44 cw(c5744.33,3835.67) 5768.1,3835.67 ccw(c5783.7,3835.67) 5783.7,3820.07 5841.96,3820.07 5900.22,3820.07 5910,3820.07 ; 5492.6,4110.75 ccw(c5453.93,4110.75) 5481.27,4138.1 ; 5768.1,4700.22 5768.1,4641.96 5768.1,4583.7 cw(c5744.33,4583.7) 5744.33,4559.93 ccw(c5744.33,4544.33) 5728.73,4544.33 cw(c5704.96,4544.33) 5704.96,4520.56 ccw(c5704.96,4504.96) 5689.36,4504.96 cw(c5665.59,4504.96) 5665.59,4481.19 ccw(c5665.59,4465.59) 5649.99,4465.59 cw(c5626.22,4465.59) 5626.22,4441.82 ccw(c5626.22,4426.22) 5610.62,4426.22 cw(c5586.85,4426.22) 5586.85,4402.45 ccw(c5586.85,4386.85) 5571.25,4386.85 cw(c5547.48,4386.85) 5547.48,4363.08 ccw(c5547.48,4347.48) 5531.88,4347.48 cw(c5508.11,4347.48) 5508.11,4323.71 ccw(c5508.11,4308.11) 5492.51,4308.11 cw(c5468.74,4308.11) 5485.55,4291.3 5479.13,4283.57 ; 5809.68,3542.43 ccw(c5798.22,3553.88) v1@5814.17,3556.71 ; 5810.89,3543.64 cw(c5823.52,3531.01) v1@5823.52,3548.87 ; 5815.1,3547.85 ccw(c5807.44,3555.52) v1@5818.11,3557.41
  MidLayer1 w20: TP7.1@56.12,3608.23 cw(c7.84,3608.23) 41.98,3574.09 cw(c76.12,3539.95) TP7.1@76.12,3588.23 ; TP7.1@76.12,3608.23 24,3556.11 24,3339 53,3310 355,3310 376.12,3331.12 PROTOTYPE1.2@376.12,3408.23 ; PROTOTYPE1.2@361.27,3393.39 cw(c325.42,3357.54) 376.12,3357.54 cw(c426.82,3357.54) PROTOTYPE1.2@390.97,3393.39
  MidLayer2 w4: 4870,3820.07 4879.78,3820.07 4938.04,3820.07 4996.3,3820.07 ccw(c4996.3,3835.67) 5011.9,3835.67 cw(c5035.67,3835.67) 5035.67,3859.44 ccw(c5035.67,3875.04) 5051.27,3875.04 cw(c5075.04,3875.04) 5075.04,3898.81 ccw(c5075.04,3914.41) 5090.64,3914.41 cw(c5114.41,3914.41) 5114.41,3938.18 ccw(c5114.41,3953.78) 5130.01,3953.78 cw(c5153.78,3953.78) 5153.78,3977.55 ccw(c5153.78,3993.15) 5169.38,3993.15 cw(c5193.15,3993.15) 5193.15,4016.92 ccw(c5193.15,4032.52) 5208.75,4032.52 cw(c5232.52,4032.52) 5232.52,4056.29 ccw(c5232.52,4071.89) 5248.12,4071.89 ; 4870,4568.1 4879.78,4568.1 4938.04,4568.1 4996.3,4568.1 cw(c4996.3,4544.33) 5020.07,4544.33 ccw(c5035.67,4544.33) 5035.67,4528.73 cw(c5035.67,4504.96) 5059.44,4504.96 ccw(c5075.04,4504.96) 5075.04,4489.36 cw(c5075.04,4465.59) 5098.81,4465.59 ccw(c5114.41,4465.59) 5114.41,4449.99 cw(c5114.41,4426.22) 5138.18,4426.22 ccw(c5153.78,4426.22) 5153.78,4410.62 cw(c5153.78,4386.85) 5177.55,4386.85 ccw(c5193.15,4386.85) 5193.15,4371.25 cw(c5193.15,4347.48) 5216.92,4347.48 ccw(c5232.52,4347.48) 5232.52,4331.88 cw(c5232.52,4308.11) 5256.29,4308.11 5256.29,4288.55 ; v1@4881.86,4800.04 4883,4801.18 v1(4883,4803) ; 5011.9,4710 5011.9,4700.22 5011.9,4641.96 5011.9,4583.7 ccw(c5035.67,4583.7) 5035.67,4559.93 cw(c5035.67,4544.33) 5051.27,4544.33 ccw(c5075.04,4544.33) 5075.04,4520.56 cw(c5075.04,4504.96) 5090.64,4504.96 ccw(c5114.41,4504.96) 5114.41,4481.19 cw(c5114.41,4465.59) 5130.01,4465.59 ccw(c5153.78,4465.59) 5153.78,4441.82 cw(c5153.78,4426.22) 5169.38,4426.22 ccw(c5193.15,4426.22) 5193.15,4402.45 cw(c5193.15,4386.85) 5208.75,4386.85 ccw(c5232.52,4386.85) 5232.52,4363.08 cw(c5232.52,4347.48) 5248.12,4347.48 ; 5020.07,3679.78 5020.07,3738.04 5020.07,3796.3 cw(c5035.67,3796.3) 5035.67,3811.9 ccw(c5035.67,3835.67) 5059.44,3835.67 cw(c5075.04,3835.67) 5075.04,3851.27 ccw(c5075.04,3875.04) 5098.81,3875.04 cw(c5114.41,3875.04) 5114.41,3890.64 ccw(c5114.41,3914.41) 5138.18,3914.41 cw(c5153.78,3914.41) 5153.78,3930.01 ccw(c5153.78,3953.78) 5177.55,3953.78 cw(c5193.15,3953.78) 5193.15,3969.38 ccw(c5193.15,3993.15) 5216.92,3993.15 cw(c5232.52,3993.15) 5232.52,4008.75 ccw(c5232.52,4032.52) 5256.29,4032.52 ; 5248.03,4071.98 5248.03,4110.75 cw(c5286.7,4110.75) 5259.36,4138.1 ; 5255.08,4330.67 cw(c5271.89,4347.48) 5248.12,4347.48 ; 5256.38,4288.45 ccw(c5266.53,4288.45) 5259.36,4281.27 ; v3@5264.55,4150.63 cw(c5246.82,4150.63) 5259.36,4138.1 ; v3@5264.55,4268.74 ccw(c5246.82,4268.74) 5259.36,4281.27 ; v3@5271.89,4143.29 ccw(c5271.89,4125.56) 5259.36,4138.1 ; v3@5271.89,4276.08 cw(c5271.89,4293.81) 5259.36,4281.27 ; 5271.98,4048.03 5310.75,4048.03 ccw(c5310.75,4086.7) 5338.1,4059.36 ; 5291.45,4323.71 5271.89,4323.71 cw(c5271.89,4347.48) 5248.12,4347.48 ; 5291.55,4323.62 cw(c5291.55,4313.47) 5298.73,4320.64 ; v3@5343.29,4071.89 cw(c5325.56,4071.89) 5338.1,4059.36 ; v3@5350.63,4064.55 ccw(c5350.63,4046.82) 5338.1,4059.36 ; v3@5429.37,4315.45 ccw(c5429.37,4333.18) 5441.9,4320.64 ; v3@5436.71,4308.11 cw(c5454.44,4308.11) 5441.9,4320.64 ; 5488.45,4056.38 cw(c5488.45,4066.53) 5481.27,4059.36 ; 5488.55,4056.29 5508.11,4056.29 cw(c5508.11,4032.52) 5531.88,4032.52 ccw(c5547.48,4032.52) 5547.48,4016.92 cw(c5547.48,3993.15) 5571.25,3993.15 ccw(c5586.85,3993.15) 5586.85,3977.55 cw(c5586.85,3953.78) 5610.62,3953.78 ccw(c5626.22,3953.78) 5626.22,3938.18 cw(c5626.22,3914.41) 5649.99,3914.41 ccw(c5665.59,3914.41) 5665.59,3898.81 cw(c5665.59,3875.04) 5689.36,3875.04 ccw(c5704.96,3875.04) 5704.96,3859.44 cw(c5704.96,3835.67) 5728.73,3835.67 ccw(c5744.33,3835.67) 5744.33,3820.07 cw(c5744.33,3796.3) 5768.1,3796.3 5768.1,3738.04 ; 5508.02,4331.97 5469.25,4331.97 ccw(c5469.25,4293.3) 5441.9,4320.64 ; v3@5508.11,4103.92 cw(c5508.11,4086.19) 5520.64,4098.73 ; v3@5508.11,4236.71 ccw(c5508.11,4254.44) 5520.64,4241.9 ; v3@5515.45,4111.26 ccw(c5533.18,4111.26) 5520.64,4098.73 ; v3@5515.45,4229.37 cw(c5533.18,4229.37) 5520.64,4241.9 ; 5523.62,4091.55 ccw(c5513.47,4091.55) 5520.64,4098.73 ; 5523.71,4091.45 5523.71,4071.89 ccw(c5547.48,4071.89) 5547.48,4048.12 cw(c5547.48,4032.52) 5563.08,4032.52 ccw(c5586.85,4032.52) 5586.85,4008.75 cw(c5586.85,3993.15) 5602.45,3993.15 ccw(c5626.22,3993.15) 5626.22,3969.38 cw(c5626.22,3953.78) 5641.82,3953.78 ccw(c5665.59,3953.78) 5665.59,3930.01 cw(c5665.59,3914.41) 5681.19,3914.41 ccw(c5704.96,3914.41) 5704.96,3890.64 cw(c5704.96,3875.04) 5720.56,3875.04 ccw(c5744.33,3875.04) 5744.33,3851.27 cw(c5744.33,3835.67) 5759.93,3835.67 ccw(c5783.7,3835.67) 5783.7,3811.9 5841.96,3811.9 ; 5531.88,4308.11 cw(c5547.48,4308.11) 5547.48,4323.71 ccw(c5547.48,4347.48) 5571.25,4347.48 cw(c5586.85,4347.48) 5586.85,4363.08 ccw(c5586.85,4386.85) 5610.62,4386.85 cw(c5626.22,4386.85) 5626.22,4402.45 ccw(c5626.22,4426.22) 5649.99,4426.22 cw(c5665.59,4426.22) 5665.59,4441.82 ccw(c5665.59,4465.59) 5689.36,4465.59 cw(c5704.96,4465.59) 5704.96,4481.19 ccw(c5704.96,4504.96) 5728.73,4504.96 cw(c5744.33,4504.96) 5744.33,4520.56 ccw(c5744.33,4544.33) 5768.1,4544.33 cw(c5783.7,4544.33) 5783.7,4559.93 5841.96,4559.93 5900.22,4559.93 5910,4559.93 ; 5531.97,4308.02 5531.97,4269.25 cw(c5493.3,4269.25) 5520.64,4241.9 ; 5759.93,4710 5759.93,4700.22 5759.93,4641.96 5759.93,4583.7 cw(c5744.33,4583.7) 5744.33,4568.1 ccw(c5744.33,4544.33) 5720.56,4544.33 cw(c5704.96,4544.33) 5704.96,4528.73 ccw(c5704.96,4504.96) 5681.19,4504.96 cw(c5665.59,4504.96) 5665.59,4489.36 ccw(c5665.59,4465.59) 5641.82,4465.59 cw(c5626.22,4465.59) 5626.22,4449.99 ccw(c5626.22,4426.22) 5602.45,4426.22 cw(c5586.85,4426.22) 5586.85,4410.62 ccw(c5586.85,4386.85) 5563.08,4386.85 cw(c5547.48,4386.85) 5547.48,4371.25 ccw(c5547.48,4347.48) 5523.71,4347.48 ; 5256.29,4032.52 cw(c5271.89,4032.52) 5271.89,4048.12 ccw(c5271.89,4032.52) 5256.29,4032.52 ; 5298.73,4320.64 cw(c5286.19,4308.11) 5303.92,4308.11 ccw(c5286.19,4308.11) 5298.73,4320.64 ; 5298.73,4320.64 ccw(c5311.26,4333.18) 5311.26,4315.45 cw(c5311.26,4333.18) 5298.73,4320.64 ; v3@5476.08,4071.89 ccw(c5493.81,4071.89) 5481.27,4059.36 ; v3@5476.08,4071.89 ccw(c5493.81,4071.89) 5481.27,4059.36 ; v3@5476.08,4071.89 ccw(c5493.81,4071.89) 5481.27,4059.36 ; 5481.27,4059.36 ccw(c5468.74,4046.82) 5468.74,4064.55 cw(c5468.74,4046.82) 5481.27,4059.36 ; 5523.71,4347.48 cw(c5508.11,4347.48) 5508.11,4331.88 ccw(c5508.11,4347.48) 5523.71,4347.48
  MidLayer2 w12: v1@4883,4801.18 4883.91,4802.09 4884.82,4803 4946.41,4803 4982.36,4838.95 4982.36,4997.36 5020,5035 5150,5035 5165.04,5050.04 5239.96,5050.04 v1(5240,5050) ; v1@4886.89,4799.11 cw(c4896.28,4789.72) 4896.28,4803 cw(c4896.28,4816.28) v1@4886.89,4806.89 ; 5226.62,5050.04 cw(c5226.62,5036.62) v1@5236.11,5046.11 ; 5226.82,5050.04 ccw(c5226.82,5063.18) v1@5236.11,5053.89
  MidLayer2 w20: v10(-350,3770) -350,3800 -335,3815 -225,3815 -210,3800 -210,3735 -235.5,3709.5 -285.5,3709.5 -310,3685 -310,3640 -278.23,3608.23 TP7.1@76.12,3608.23 ; TP7.1@61.98,3594.09 ccw(c27.84,3559.95) 27.84,3608.23 ccw(c27.84,3656.52) TP7.1@61.98,3622.38 ; PROTOTYPE1.2@361.27,3393.39 cw(c325.42,3357.54) 376.12,3357.54 cw(c426.82,3357.54) PROTOTYPE1.2@390.97,3393.39 ; PROTOTYPE1.2@376.12,3408.23 376.12,3343.88 410,3310 720,3310 730,3300 730,3235 705,3210 580,3210 545,3175 545,3100 565,3080 955,3080 965.81,3090.81 v1(965.81,3143.04)
  Bottom Layer w4: 4870,3969.29 5076.1,3969.29 ; 4938.04,3969.38 5153.78,3969.38 ccw(c5153.78,3993.15) 5177.55,3993.15 cw(c5193.15,3993.15) 5193.15,4008.75 ccw(c5193.15,4032.52) 5216.92,4032.52 cw(c5232.52,4032.52) 5232.52,4048.12 ccw(c5232.52,4071.89) 5249.33,4055.08 5257.06,4061.5 ; v1@5237.45,5047.45 v1@5234.9,5050 ; v1(5240,5050) v1@5234.9,5050 ; v3@5264.5,4073.19 cw(c5246.67,4076.34) 5257.06,4061.5 ; v3@5270.59,4064.5 ccw(c5267.44,4046.67) 5257.06,4061.5 ; v1(5273.52,3253.37) v1@5277.52,3257.37 ; 5287.4,3670 5287.4,3876.1 ; 5287.4,3677.4 5287.4,3895.52 5287.4,3969.64 5287.4,3989.14 cw(c5329.13,3989.14) 5299.62,4018.65 ; v3@5303.79,4031.87 cw(c5285.75,4030.29) 5299.62,4018.65 ; v3@5311.91,4025.05 ccw(c5313.49,4007.01) 5299.62,4018.65 ; v3@5468.09,4354.95 ccw(c5466.51,4372.99) 5480.38,4361.35 ; v3@5476.21,4348.13 cw(c5494.25,4349.71) 5480.38,4361.35 ; v1@5488.28,4868.28 cw(c5477.85,4857.85) 5492.6,4857.85 ; 5492.6,4846.28 cw(c5523.72,4846.28) v1@5501.72,4868.28 ; 5492.6,4855.94 cw(c5514.06,4855.94) v1@5498.89,4871.11 ; v1(5495,4875) 5492.6,4872.6 5492.6,4831.63 5492.6,4830 5492.6,4724.74 5492.6,4720 5492.6,4710 5492.6,4503.9 5492.6,4484.48 5492.6,4410.36 5492.6,4390.86 cw(c5450.87,4390.86) 5480.38,4361.35 ; v3@5509.41,4315.5 ccw(c5512.56,4333.33) 5522.94,4318.5 ; v3@5515.5,4306.81 cw(c5533.33,4303.66) 5522.94,4318.5 ; v3@5548.13,4276.21 ccw(c5549.71,4294.25) 5561.35,4280.38 ; v3@5554.95,4268.09 cw(c5572.99,4266.51) 5561.35,4280.38 ; 5910,4292.6 5590.86,4292.6 ccw(c5590.86,4250.87) 5561.35,4280.38 ; 5910,4410.62 5626.22,4410.62 ccw(c5626.22,4386.85) 5602.45,4386.85 cw(c5586.85,4386.85) 5586.85,4371.25 ccw(c5586.85,4347.48) 5563.08,4347.48 cw(c5547.48,4347.48) 5547.48,4331.88 ccw(c5547.48,4308.11) 5530.67,4324.92 5522.94,4318.5 ; v2@6961.19,1904.37 v2(6970.63,1904.37) ; v1@5234.86,5050.04 v1@5234.9,5050
  Bottom Layer w12: R207.2@3300.06,1630.75 cw(c3290.98,1621.67) 3303.82,1621.67 cw(c3316.66,1621.67) R207.2@3307.58,1630.75 ; R207.2@3303.82,1635 3303.82,1620 3313.82,1610 3395,1610 3406.93,1598.07 3406.93,1570 v1(3435,1541.93) ; v1@3429.5,1541.93 ccw(c3416.22,1541.93) 3425.61,1551.32 ccw(c3435,1560.71) v1@3435,1547.43 ; v1(5306.86,2858.37) 5306.86,2843.14 5315,2835 C193.1@5365.39,2835 C192.1@5365.39,2715 ; C192.1@5361.28,2719.11 ccw(c5351.36,2729.03) 5365.39,2729.03 ccw(c5379.42,2729.03) C192.1@5369.5,2719.11 ; C193.1@5361.28,2839.11 cw(c5351.36,2849.03) 5351.36,2835 cw(c5351.36,2820.97) 5361.28,2830.89 cw(c5351.36,2820.97) 5365.39,2820.97 cw(c5379.42,2820.97) C193.1@5369.5,2830.89
  other v1: 3435,1438.07 3457.5,1438.07 3480,1438.07 3555,1438 3577.5,1438 3600,1438 3622.5,1438 3645,1438 3667.5,1438 3457.5,1541.93 3480,1541.93 3348.7,1750.67 3470.75,1750.67 3348.7,1773.17 3470.75,1773.17 3348.7,1795.67 3470.75,1795.67 997.62,3003.81 997.31,3143.04
1V2SET: R207.1 R208.1 U42.5 | length 432.8
  Bottom Layer w12: R207.1@3346.18,1635 R208.1@3438.82,1635 3438.82,1598.01 3438.82,1581.18 3445,1575 3505,1575 3595,1575 3636.14,1533.86 U42.5@3636.14,1525 ; R207.1@3349.94,1631.24 cw(c3359.02,1622.16) 3359.02,1635 cw(c3359.02,1647.84) R207.1@3349.94,1638.76 ; R208.1@3435.06,1630.75 cw(c3425.98,1621.67) 3438.82,1621.67 cw(c3451.66,1621.67) R208.1@3442.58,1630.75 ; R208.1@3435.06,1631.24 ccw(c3425.98,1622.16) 3425.98,1635 ccw(c3425.98,1647.84) R208.1@3435.06,1638.76
1V8: C128.1 C129.1 EXTHDR1.77 EXTHDR1.79 PROTOTYPE1.4 R201.2 TP6.1 U39.2 | length 2633.3
  Top Layer w12: v1@902.98,3142.02 EXTHDR1.79@902.97,3071.85 v1@902.98,3142.88 ; v1@930.43,3139.15 cw(c920.66,3129.38) 934.47,3129.38 ; EXTHDR1.77@934.47,3071.85 v1@934.47,3142.88 ; 934.47,3130.14 cw(c947.21,3130.14) v1@938.2,3139.15 ; v1@898.93,3139.15 cw(c889.16,3129.38) 902.98,3129.38 ccw(c889.16,3129.38) v1@898.93,3139.15 ; 902.98,3130.14 cw(c915.72,3130.14) 906.71,3139.15 ccw(c915.72,3130.14) 902.98,3130.14
  MidLayer1 w20: TP6.1@56.12,3708.23 cw(c7.84,3708.23) 41.98,3674.09 cw(c76.12,3639.95) TP6.1@76.12,3688.23 ; TP6.1@76.12,3708.23 0,3632.11 0,3310 25,3285 452.89,3285 PROTOTYPE1.4@576.12,3408.23 ; PROTOTYPE1.4@555.12,3408.23 cw(c504.42,3408.23) 540.27,3372.39 cw(c576.12,3336.54) PROTOTYPE1.4@576.12,3387.23
  MidLayer2 w20: PROTOTYPE1.4@576.12,3387.23 cw(c576.12,3336.54) 611.97,3372.39 cw(c647.82,3408.23) PROTOTYPE1.4@597.12,3408.23 ; PROTOTYPE1.4@576.12,3408.23 639.36,3345 925,3345 955,3315 955,3210 934.31,3189.31 v1(934.31,3143.04)
  Bottom Layer w20: 2860.6,1684.26 cw(c2902.01,1642.85) v1@2902.01,1701.41 ; R201.2@2868.82,1625 2868.82,1692.48 C129.1@2940.28,1763.94 ; 2869.98,1693.64 cw(c2940.28,1623.34) C129.1@2940.28,1722.76 ; 2879.48,1703.14 ccw(c2822.62,1760) C129.1@2903.03,1760 ; 2883.51,1702.91 cw(c2893.78,1702.91) 2886.52,1710.18 ; C129.1@2894.74,1718.4 cw(c2902.01,1711.14) C129.1@2902.01,1721.41 ; v1@2903.51,1702.91 cw(c2962.07,1702.91) C129.1@2920.66,1744.32 ; C129.1@2904.12,1727.78 cw(c2940.28,1691.62) C129.1@2940.28,1742.76
  other v1: 2358,1438.01 2383,1438.01 2408,1438.01 2580,1450 2358,1464.01 2383,1464.01 2408,1464.01 2358,1490 2383,1490 2408,1490 2545,1490 2615,1490 2358,1516 2383,1516 2408,1516 2545,1516.67 2615,1516.67 2358,1542 2383,1542 2408,1542 2545,1543.33 2615,1543.33 2545,1570 2615,1570 2356.01,1584.87 2382,1584.87 2408,1584.87 2515,1605 2540.99,1605 2615,1605 2640.99,1605 2335,1617.01 2820,1629 2846,1629 2515,1630 2540.99,1630 2615,1630 2640.99,1630 2335,1643.01 2515,1655 2540.99,1655 2615,1655 2640.99,1655 2820,1655 2846,1655 2335,1669 2206.02,1670.99 2232.01,1670.99 2258.01,1670.99 2284,1671 2310,1671 2820,1681 2335,1695 2232.01,1695.99 2258.01,1695.99 2284,1696 2310,1696 2902.01,1702.91 2924.51,1702.91 2947.01,1702.91 3003,1711 3029,1711 3055,1711 3080.99,1711 3106.99,1711 3003,1736 3029,1736 3055,1736 3080.99,1736 3106.99,1736 2879.25,1740.67 2820,1760 2844,1760 3003,1761 3029,1761 3055,1761 3080.99,1761 3106.99,1761 2879.25,1763.17 2335,1768.01 2206.02,1770 2232.01,1770 2258.01,1770 2284,1770 2310,1770 2820,1785 2844,1785 2879.25,1785.67 2335,1794 2232.01,1795 2258.01,1795 2284,1795 2310,1795 2258.01,1820 2284,1820 2310,1820 2335,1820 2820,1871.99 2845,1871.99 2870,1871.99 2191.14,1885 2295,1885 3019.98,1887 3045.98,1887 3071.98,1887 3097.97,1887.01 2335,1894 2820,1897.99 2845,1897.99 2191.14,1907.5 2295,1907.5 2993.99,1912 3019.98,1912 3045.98,1912 3071.98,1912 3097.97,1912.01 2335,1920 2820,1923.98 2191.14,1930 2295,1930 2967.99,1937 2993.99,1937 3019.98,1937 3045.98,1937 3071.98,1937 3097.97,1937.01 2335,2010.02 2335,2036.01 2106,2040 2131.99,2040 2869.99,2053.96 2335,2062.01 2106,2065 2131.99,2065 2231.02,2088 2257.01,2088 2283.01,2088 2309,2088 2335,2088 2106,2090 2131.99,2090 2231.02,2114 2257.01,2114 2283.01,2114 2309,2114 2335,2114 2106,2115 2131.99,2115 2156.99,2115 2181.99,2115 2106,2140 2131.99,2140 2156.99,2141 2181.99,2141 2106,2165 2131.99,2165 2106,2190 2131.99,2190 2362.01,2191.99 2388.01,2191.99 2414,2191.99 2440,2191.99 2362.01,2216.99 2388.01,2216.99 2414,2216.99 2440,2216.99 2336.01,2241.99 2362.01,2241.99 2388.01,2241.99 2414,2241.99 2440,2241.99 902.82,3143.04
1V8SET: R201.1 R202.1 U39.1 | length 450.7
  Bottom Layer w12: U39.1@2680,1525 2715,1560 2880,1560 2911.18,1591.18 R201.1@2911.18,1625 ; R201.1@2906.09,1625 R201.1@2911.18,1625 ; R201.1@2907.42,1620.75 cw(c2898.34,1611.67) 2911.18,1611.67 cw(c2924.02,1611.67) R201.1@2914.94,1620.75 ; R201.1@2914.94,1621.24 cw(c2924.02,1612.16) 2924.02,1625 cw(c2924.02,1637.84) R201.1@2914.94,1628.76 ; R202.1@3000.06,1621.24 ccw(c2990.98,1612.16) 2990.98,1625 ccw(c2990.98,1637.84) R202.1@3000.06,1628.76 ; R202.1@3003.82,1625 R201.1@2911.18,1625
2V5: C132.1 C133.1 C138.1 C139.1 EXTHDR1.81 EXTHDR1.83 PROTOTYPE1.6 R203.2 TP5.1 U40.2 U42.1 U42.2 | length 1570
  Top Layer w12: v1@835.94,3139.15 cw(c826.17,3129.38) 839.98,3129.38 ; EXTHDR1.83@839.98,3071.85 v1@839.98,3142.88 ; 839.98,3130.14 cw(c852.73,3130.14) v1@843.72,3139.15 ; v1@867.43,3139.15 cw(c857.66,3129.38) 871.48,3129.38 ; EXTHDR1.81@871.48,3071.85 v1@871.48,3142.88 ; 871.48,3130.14 cw(c884.22,3130.14) v1@875.21,3139.15
  MidLayer2 w20: TP5.1@76.12,3788.23 cw(c76.12,3739.95) 110.26,3774.09 cw(c144.41,3808.23) TP5.1@96.12,3808.23 ; TP5.1@76.12,3808.23 124.36,3760 710,3760 725,3745 725,3459.36 PROTOTYPE1.6@776.12,3408.23 ; PROTOTYPE1.6@755.12,3408.23 ccw(c704.42,3408.23) 740.27,3444.08 ccw(c776.12,3479.93) PROTOTYPE1.6@776.12,3429.23
  Bottom Layer w12: R203.2@1780.06,1629.25 ccw(c1770.98,1638.33) 1783.82,1638.33 ccw(c1796.66,1638.33) R203.2@1787.58,1629.25 ; R203.2@1783.82,1625 1783.82,1654.72 v1@1832.01,1702.91 ; 1809.82,1680.72 ccw(c1787.62,1702.91) v1@1819.01,1702.91 ; 1812.01,1682.92 cw(c1847.01,1647.92) v1@1847.01,1697.41 ; v1@1832.5,1703.4 cw(c1847.01,1688.89) v1@1847.01,1709.41
  other v1: 1273,1438.01 1298,1438.01 1323,1438.01 4054.02,1438.07 4076.52,1438.07 4099.02,1438.07 1495,1450 1273,1464.01 1298,1464.01 1323,1464.01 1273,1490 1298,1490 1323,1490 1460,1490 1530,1490 1273,1516 1298,1516 1323,1516 1460,1516.67 1530,1516.67 1273,1542 1298,1542 1323,1542 4054.02,1541.93 4076.52,1541.93 4099.02,1541.93 1460,1543.33 1530,1543.33 1460,1570 1530,1570 1271,1585 1297,1585 1322.99,1585 1637.01,1585 1663.01,1585 1689,1585 1715,1585 1430,1605 1456,1605 1530,1605 1556,1605 1735,1607.01 1760.01,1608.05 1255,1609 1430,1630 1456,1630 1530,1630 1556,1630 1735,1633.01 1760.01,1634.04 1255,1635 1430,1655 1456,1655 1530,1655 1556,1655 1735,1659 1760.01,1660.04 1255,1661 1923,1668.01 1948,1668.01 1973,1668.01 1998,1668.01 2023,1668.01 1735,1685 1760.01,1686.04 1255,1686.99 1923,1694.01 1948,1694.01 1973,1694.01 1998,1694.01 2023,1694.01 1106.02,1700 1132.01,1700 1158.01,1700 1184,1700 1210,1700 1802.01,1702.91 1824.51,1702.91 1847.01,1702.91 4107.01,1702.91 4129.51,1702.91 4152.01,1702.91 1735,1711 1760.01,1712.03 1255,1712.99 1923,1720 1948,1720 1973,1720 1998,1720 2023,1720 1106.02,1725 1132.01,1725 1158.01,1725 1184,1725 1210,1725 1735,1736.99 1760.01,1738.03 1255,1738.98 1923,1746 1948,1746 1973,1746 1998,1746 2023,1746 1106.02,1750 1132.01,1750 1158.01,1750 1184,1750 1210,1750 1735,1762.99 1760,1764.02 1255,1764.98 1923,1772 1948,1772 1973,1772 1998,1772 1106.02,1775 1132.01,1775 1158.01,1775 1184,1775 1210,1775 1735,1788.98 1760,1790.02 1255,1790.98 1735,1814.98 1760,1816.02 1802.01,1824.96 1824.51,1824.96 1847.01,1824.96 4107.01,1824.96 4129.51,1824.96 4152.01,1824.96 1735,1840.98 1760,1842.01 1250.77,1856.04 1250.77,1882.03 1106.14,1885 1210,1885 1106.14,1907.5 1210,1907.5 1250.77,1908.03 1734.99,1926.97 1760,1928.01 1106.14,1930 1210,1930 1250.77,1934.03 1734.99,1952.97 1760,1954 1734.99,1978.96 1760,1980 1250,2010 1735,2025 1250,2036 1735,2074 1735,2100 1735,2126 1331,2145 1356.99,2145 1426,2145 1451.99,2145 1477.99,2145 1503.98,2145 1529.98,2145 1555.98,2145 1581.97,2145.01 1607.97,2145.01 1633.96,2145.01 1659.96,2145.01 1685.96,2145.01 1711.95,2145.01 1829,2172 1855,2172 1880.99,2172 1906.99,2172 1803,2197 1829,2197 1855,2197 1880.99,2197 1906.99,2197 1803,2222 1829,2222 1855,2222 1880.99,2222 1906.99,2222 1803,2247 1829,2247 1855,2247 1880.99,2247 1906.99,2247 839.83,3143.04 871.32,3143.04
2V5SET: R203.1 R204.1 U40.1 | length 445.6
  Bottom Layer w12: U40.1@1595,1520 1630,1555 1795,1555 1826.18,1586.18 R203.1@1826.18,1620 ; R203.1@1822.42,1620.75 cw(c1813.34,1611.67) 1826.18,1611.67 cw(c1839.02,1611.67) R203.1@1829.94,1620.75 ; R203.1@1826.18,1625 R204.1@1918.82,1625 ; R203.1@1829.94,1621.24 cw(c1839.02,1612.16) 1839.02,1625 cw(c1839.02,1637.84) R203.1@1829.94,1628.76 ; R204.1@1915.06,1621.24 ccw(c1905.98,1612.16) 1905.98,1625 ccw(c1905.98,1637.84) R204.1@1915.06,1628.76